# Altium PCB asar_feather.PcbDoc (part 4 of 4)
Units mm, origin at the board's own origin, x right, y up, seen from the top; angles counter-clockwise.
Board outline 50.8 x 22.86 mm, 6 copper layers (Top Layer, L2-GND, L3-SIG, L4-SIG, L5-VCC3V3, Bottom Layer), stack 1.568 mm thick; 174 components, 154 nets, 827 pads, 1521 vias.
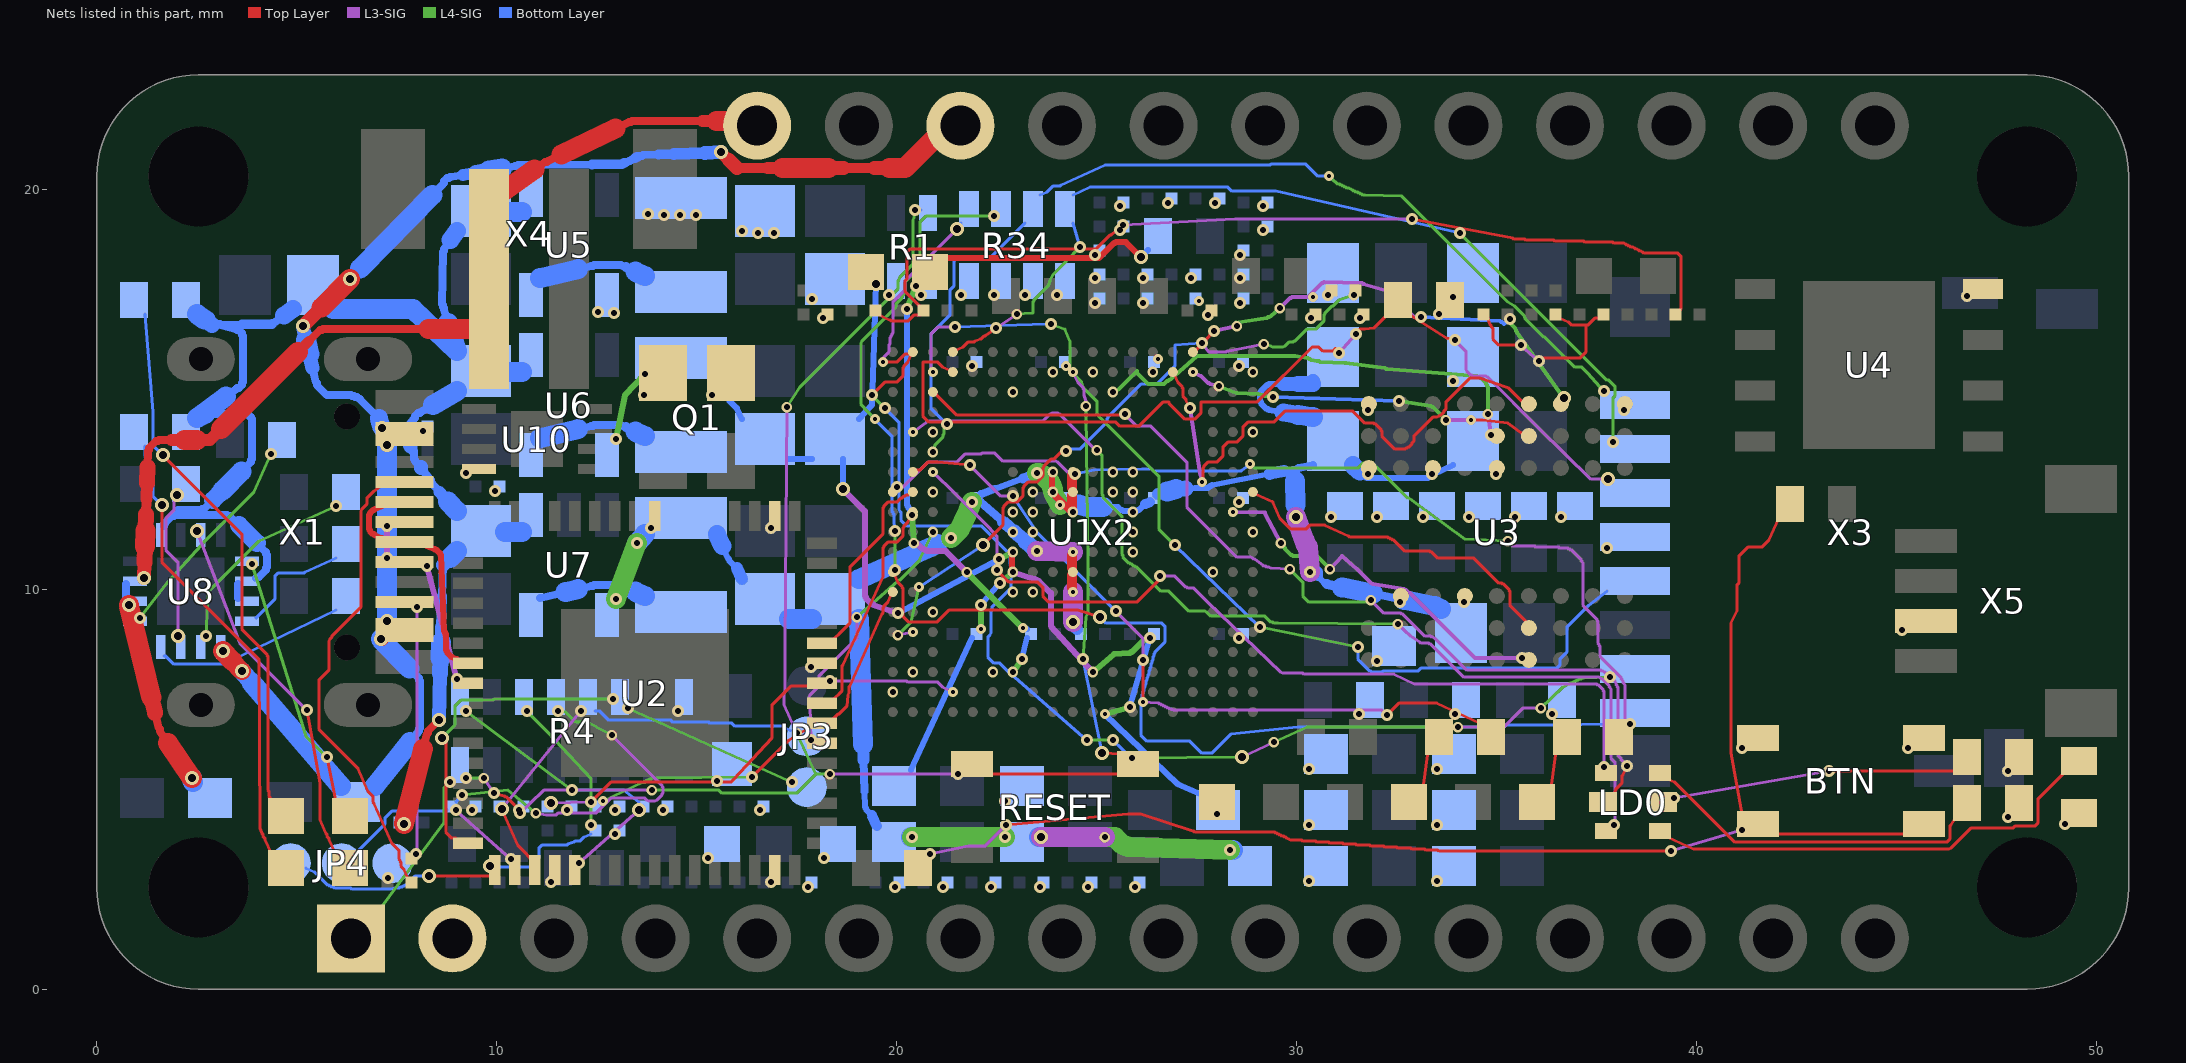
[diagram p7: the nets of this part, all layers, seen from the top]

## Via types
v1: diameter 0.27, hole 0.15, L3-SIG to L4-SIG, tented both sides, 233 vias
v2: diameter 0.3, hole 0.15, L5-VCC3V3 to Bottom Layer, tented both sides, 219 vias
v3: diameter 0.3, hole 0.15, Top Layer to L2-GND, tented both sides, 208 vias
v4: diameter 0.25, hole 0.1, Top Layer to L2-GND, tented both sides, 175 vias
v5: diameter 0.3, hole 0.15, L2-GND to L3-SIG, tented both sides, 171 vias
v6: diameter 0.3, hole 0.15, L4-SIG to L5-VCC3V3, tented both sides, 171 vias
v7: diameter 0.35, hole 0.2, Top Layer to Bottom Layer, tented both sides, 165 vias
v8: diameter 0.25, hole 0.1, L2-GND to L3-SIG, tented both sides, 106 vias
v9: diameter 0.25, hole 0.1, L4-SIG to L5-VCC3V3, tented both sides, 49 vias
v10: diameter 0.25, hole 0.1, L5-VCC3V3 to Bottom Layer, tented both sides, 24 vias

## Nets (pads, with @x,y where several pads share a name; then routed paths per layer and width w, separated by ;. In a path a pad name is that pad's centre, name@x,y a point inside that pad or via, vN(x,y) a via of type N, cw(c..) or ccw(c..) an arc to the next point about the centre after c; other vN are vias at no path point) (continued)
LDQM: U1.U8 U3.E8 | length 11.4
  L3-SIG w0.1: v1(34.775,14.375) v3(34.85,13.85)
  L4-SIG w0.1: v1@25.4,14.925 25.55,15 26.002,15.452 ; 25.975,15.425 26.25,15.15 26.3,15.125 26.675,15.125 26.75,15.2 26.775,15.2 26.8,15.225 26.85,15.25 27.5,15.825 ; 27.49,15.825 29.95,15.825 30.264,15.783 ; 30.275,15.775 30.3,15.75 30.325,15.75 30.35,15.725 30.5,15.7 30.55,15.7 30.575,15.675 31.225,15.65 ; 31.217,15.656 32.2,15.525 32.225,15.5 32.25,15.5 34.5,15.325 34.525,15.3 34.55,15.3 34.6,15.275 34.725,15.15 34.725,15.125 34.75,15.1 34.75,15.075 34.775,15.05 v1(34.775,14.375)
  other v1: 25.4,14.93
  other v4: 25.4,14.93
  other v5: 34.85,13.85
  other v8: 25.4,14.93
LED0_B: LD0.2 U1.N17 | length 22.1
  Top Layer w0.076: v3(22.5,10.475) 22.8,10.175 23.525,10.175 23.65,10.05 23.65,9.825 23.8,9.675 26,9.675 26.575,10.25 v3(26.575,10.325)
  L3-SIG w0.076: v8@20.9,12.925 21.275,12.575 22.3,11.55 22.5,11.325 v3(22.5,10.475) ; v3(26.575,10.325) 26.95,10.325 27.225,10.05 27.25,10.05 27.275,10.025 27.425,10.025 27.775,9.675 29.6,7.925 29.65,7.9 30.15,7.9 30.175,7.875 32.425,7.875 32.95,7.625 37.5,7.625 37.525,7.6 37.55,7.6 37.65,7.5 37.65,7.475 37.675,7.45 v3(37.675,5.55)
  other v4: 20.9,12.93
  other v5: 37.675,5.55 26.575,10.325 22.5,10.475
  other v8: 20.9,12.93
LED0_G: LD0.6 U1.R18 | length 25.1
  L3-SIG w0.076: v8@20.4,13.925 20.775,14.2 23.65,14.2 23.825,14.375 23.85,14.375 23.875,14.4 24.025,14.4 24.05,14.375 24.075,14.375 24.975,13.475 v1(25,13.475) ; v1(32.525,9.125) 32.85,8.825 32.925,8.775 33,8.725 33.075,8.675 33.1,8.65 33.3,8.65 33.325,8.625 33.35,8.625 34.175,7.8 37.55,7.8 37.6,7.775 37.625,7.75 37.65,7.75 37.8,7.6 37.8,7.575 37.825,7.55 37.85,7.5 37.85,5.775 37.95,5.675 37.95,4.125 v3(37.925,4.1)
  L4-SIG w0.076: v1(25,13.475) 25.125,13.35 25.125,12.375 25.15,12.35 25.15,12.3 25.625,11.825 25.625,10.875 25.65,10.85 25.65,10.8 25.8,10.65 25.825,10.65 25.85,10.625 25.875,10.625 25.925,10.575 25.95,10.575 25.975,10.55 26,10.55 26.6,9.95 26.8,9.95 27.3,9.45 27.7,9.45 27.75,9.425 27.85,9.325 29.2,9.325 29.35,9.175 29.4,9.175 29.425,9.15 29.525,9.15 v1(32.525,9.125)
  other v4: 20.4,13.93
  other v5: 37.925,4.1
  other v8: 20.4,13.93
LED0_R: LD0.4 U1.U17 | length 23.9
  Top Layer w0.076: U1.U17@20.975,14.875 21.5,14.35 25.675,14.35 v3(25.7,14.375) ; LD0.4@37.925,4.875 37.975,5 38.125,5.15 38.125,5.325 38.15,5.35 v3(38.25,5.575)
  L3-SIG w0.076: v3(25.7,14.375) 26,14.075 26.35,14.075 27.25,13.175 27.25,12.05 28.5,10.8 28.85,10.8 28.9,10.775 28.925,10.75 28.95,10.75 29.15,10.6 29.175,10.575 29.225,10.575 29.25,10.55 29.3,10.55 29.35,10.525 v1(29.825,10.5) ; v1(31.85,9.725) 32.175,9.4 32.6,9.4 32.625,9.375 32.65,9.375 33.2,8.825 33.35,8.825 33.375,8.8 33.4,8.8 33.45,8.775 34.25,7.975 37.6,7.975 37.625,7.95 37.65,7.95 37.7,7.925 37.725,7.9 37.75,7.9 37.95,7.7 37.975,7.65 37.975,7.625 38,7.6 38,7.575 38.025,7.55 38.025,5.85 38.1,5.775 38.1,5.75 38.125,5.725 v3(38.25,5.575)
  L4-SIG w0.076: v1(29.825,10.5) 30.15,10.175 30.15,9.825 30.3,9.675 31.8,9.675 v1(31.85,9.725)
  other v5: 38.25,5.575 25.7,14.375
LED1: R83.1 U1.N18 | length 18
  Top Layer w0.076: U1.N18@20.475,12.975 20.575,12.975 20.775,13.175 21.025,13.175 v3(21.825,13.1) ; v4(26.15,7.175) v3(26.15,8.225) ; v3(32.25,6.85) 32.55,7.15 33.5,7.15 R83.1@34.575,6.65
  L3-SIG w0.076: v3(21.825,13.1) 22.6,12.325 v1(22.9,12.325) ; v6(25.475,9.45) 26.15,8.775 v3(26.15,8.225) ; v4(26.15,7.175) 26.525,7.15 26.55,7.15 26.575,7.125 26.6,7.125 26.625,7.1 26.65,7.1 26.675,7.075 26.7,7.075 26.725,7.05 26.75,7.05 26.775,7.025 26.8,7.025 26.825,7 26.875,7 26.9,6.975 32.125,6.975 v3(32.25,6.85)
  Bottom Layer w0.076: v1(22.9,12.325) 23.5,11.425 v6(25.475,9.45)
  other v1: 25.475,9.45
  other v2: 25.475,9.45 22.9,12.325
  other v5: 32.25,6.85 26.15,8.225 21.825,13.1
  other v6: 22.9,12.325
  other v8: 26.15,7.175
LED2: R84.1 U1.M19 | length 23.4
  Top Layer w0.076: U1.M19@19.95,12.5 v3(20,12.55)
  L3-SIG w0.076: v3(20,12.55) 20.15,12.55 20.775,13.175 21.5,13.175 21.7,13.375 22.1,13.375 22.125,13.4 22.45,13.4 22.65,13.2 23.975,13.2 24.025,13.175 24.325,12.875 v1(24.45,12.875) ; v1(35.275,11.2) 35.4,11.075 35.95,11.075 35.975,11.05 36.55,11.05 36.575,11.025 36.775,11.025 36.8,11 36.825,11 36.85,10.975 36.875,10.975 37.1,10.75 37.1,10.725 37.125,10.7 37.15,10.65 37.15,9.6 37.5,9.25 37.5,9.225 37.525,9.2 37.525,8.65 37.55,8.625 37.55,8.6 37.575,8.575 37.575,8.325 38.1,7.8 38.1,7.775 38.125,7.75 38.15,7.7 38.15,7.675 38.175,7.65 38.2,7.6 38.2,6.75 v3(38.325,6.625)
  L4-SIG w0.076: v9(28.825,13.125) 28.925,13.025 31.525,13.025 31.65,13.15 31.9,13.15 32.775,12.275 32.8,12.275 32.875,12.225 32.975,12.15 33.075,12.075 33.175,12 33.25,11.95 33.35,11.875 33.45,11.8 33.55,11.725 33.625,11.675 33.725,11.6 33.825,11.525 33.925,11.45 34,11.4 34.1,11.325 34.2,11.25 v1(35.275,11.2)
  Bottom Layer w0.076: v1(24.45,12.875) 24.925,12.975 26.125,13 26.375,13 26.425,12.95 28.6,12.95 28.625,12.975 v9(28.825,13.125)
  other v2: 24.45,12.875
  other v5: 38.325,6.625 20,12.55
  other v6: 24.45,12.875
  other v10: 28.825,13.125
N$BTN: BTN.3 BTN.4 R85.1 R86.2 | length 32.3
  Top Layer w0.076: R86.2@20.8,3.375 v3(20.825,3.375) ; v3(22.725,4.1) 25.775,4.375 26.1,4.375 27.4,3.95 27.425,3.95 27.45,3.925 29.45,3.925 29.475,3.9 29.5,3.9 29.525,3.875 29.55,3.875 29.575,3.85 29.6,3.85 29.625,3.825 29.675,3.825 29.7,3.8 29.725,3.8 29.75,3.775 29.8,3.75 29.85,3.725 30.125,3.725 30.15,3.7 30.475,3.7 30.5,3.675 30.8,3.675 30.825,3.65 31.15,3.65 31.175,3.625 31.475,3.625 31.5,3.6 31.825,3.6 31.85,3.575 32.175,3.575 32.2,3.55 32.5,3.55 32.525,3.525 32.85,3.525 32.875,3.5 33.2,3.5 33.225,3.475 33.525,3.475 33.55,3.45 v3(39.35,3.45) ; BTN.3@41.125,4.375 40.85,5.9 40.85,9.15 41,9.45 41,10.1 41.05,10.15 41.05,10.825 41.275,11.05 41.625,11.05 41.8,11.225 R85.1@42.05,11.775 ; BTN.3@41.925,3.875 BTN.4@45.275,3.875
  L3-SIG w0.076: v3(20.825,3.375) 21.775,3.575 22.2,3.575 v3(22.725,4.1) ; v3(39.35,3.45) v3(41.125,3.975)
  other v5: 20.825,3.375 39.35,3.45 41.125,3.975 22.725,4.1
N$LD0B: LD0.1 R80.2 | length 8.3
  Top Layer w0.076: LD0.1@39.275,5.25 39.45,5.175 40.95,3.675 46.25,3.675 46.325,3.75 46.325,4.075 46.35,4.1 R80.2@46.475,4.3
N$LD0G: LD0.5 R82.2 | length 11.1
  Top Layer w0.076: LD0.5@39.275,3.8 39.925,3.5 46.3,3.5 46.35,3.525 46.85,4.025 47.9,4.025 47.95,4.075 48.45,4.075 48.525,4.15 48.525,4.75 R82.2@49.2,5.425
N$LD0R: LD0.3 R81.2 | length 7.1
  Top Layer w0.076: v3(43.3,5.45) R81.2@46.475,5.45
  L3-SIG w0.076: v3(39.425,4.775) v3(43.3,5.45)
  other v5: 39.425,4.775 43.3,5.45
N$LD1A: LD1.A R83.2 | length 0.9
  Top Layer w0.076: LD1.A@33.15,5.025 R83.2@33.275,5.95
N$LD2A: LD2.A R84.2 | length 0.9
  Top Layer w0.076: LD2.A@36.35,5.025 R84.2@36.475,5.95
NetL1_1: L1.1 U5.5 | length 2.7
  Bottom Layer w0.2: 12.031,18 12.35,18.075 12.4,18.075 12.425,18.1 13.1,18.1 13.225,18.05
  Bottom Layer w0.25: 13.225,18.05 L1.1@13.463,17.938
  Bottom Layer w0.5: U5.5@11.075,17.775 12.031,18 ; L1.1@13.463,17.938 L1.1@13.7,17.825
NetL2_1: L2.1 U6.5 | length 2.7
  Bottom Layer w0.2: 12.031,14 12.35,14.075 12.4,14.075 12.425,14.1 13.1,14.1 13.225,14.05
  Bottom Layer w0.25: 13.225,14.05 L2.1@13.463,13.938
  Bottom Layer w0.5: U6.5@11.075,13.775 12.031,14 ; L2.1@13.463,13.938 L2.1@13.7,13.825
NetL3_1: L3.1 U7.5 | length 2.7
  Bottom Layer w0.2: U7.5@11.075,9.775 11.712,9.925 ; 12.031,10 12.35,10.075 12.4,10.075 12.425,10.1 13.1,10.1 13.225,10.05
  Bottom Layer w0.25: 13.225,10.05 L3.1@13.463,9.938
  Bottom Layer w0.5: 11.712,9.925 12.031,10 ; L3.1@13.463,9.938 L3.1@13.7,9.825
NetLD3_A: LD3.A R107.1 | length 11.5
  Top Layer w0.076: v7(1.625,12.1) 1.625,10.675 4.05,8.25 4.075,4.025 4.125,3.9 4.15,3.875 4.15,3.825 4.2,3.775 4.2,3.75 LD3.A@4.375,3.375
  Bottom Layer w0.076: R107.1@1.2,13.575 1.2,13.325 1.4,13.125 1.4,12.325 v7(1.625,12.1)
NetLD3_K: LD3.K U8.7 | length 9.1
  Top Layer w0.076: v3(5.25,6.975) 5.575,5.15 5.575,4.25 5.725,3.9 5.75,3.875 5.75,3.825 5.8,3.775 5.8,3.75 LD3.K@5.975,3.375
  L3-SIG w0.076: v7(2.5,11.45) 3.575,8.65 v3(5.25,6.975)
  Bottom Layer w0.076: v7(2.5,11.45) U8.7@2.525,11.45
  other v5: 5.25,6.975
NetLD4_A: LD4.A R108.1 | length 13.4
  Top Layer w0.076: v7(1.65,13.35) 3.625,11.375 3.625,9 4.25,8.375 4.25,8.35 4.275,8.325 4.275,4.975 4.3,4.95 4.3,4.825 4.325,4.8 LD4.A@4.375,4.675
  Bottom Layer w0.076: R108.1@1.2,16.875 1.4,14.425 1.4,13.6 v7(1.65,13.35)
NetLD4_K: LD4.K U8.9 | length 6.4
  Top Layer w0.076: v1(5.75,5.8) LD4.K@5.975,4.675
  L4-SIG w0.076: v6(3.875,10.625) 5.225,6.325 v1(5.75,5.8)
  other v2: 3.875,10.625
  other v3: 5.75,5.8
  other v5: 5.75,5.8
NetR102_2: R102.2 U8.16 | length 4.7
  Bottom Layer w0.076: U8.16@1.675,8.325 1.725,8.325 1.925,8.125 3.275,8.125 3.375,8.225 R102.2@5.975,9.475
NetR103_2: R103.2 U8.12 | length 2.9
  Bottom Layer w0.076: U8.12@3.975,9.275 4.45,9.75 4.45,10.325 4.525,10.4 5.175,10.4 5.2,10.425 R103.2@5.975,10.775
NetR104_2: R104.2 U8.14 | length 5.1
  L4-SIG w0.076: v6(2.725,8.825) 2.775,9.925 4.05,11.2 v6(5.975,12.075)
  Bottom Layer w0.076: U8.14@2.675,8.775 v6(2.725,8.825)
  other v2: 2.725,8.825 5.975,12.075
NetR105_2: R105.2 U8.15 | length 3.8
  L3-SIG w0.076: v7(2,12.35) 1.925,12.225 1.925,11.975 1.725,11.775 1.725,10.975 2.025,10.675 v7(2.025,8.825)
  Bottom Layer w0.076: U8.15@2.025,8.775 v7(2.025,8.825)
NetR106_2: R106.2 U8.1 | length 5.3
  L4-SIG w0.076: v6(1.075,9.275) 1.775,10.175 2.725,11.225 3.925,12.425 v6(4.35,13.375)
  other v2: 1.075,9.275 4.35,13.375
NODE_P0: R10.1 R11.2 R12.2 | length 5
  Top Layer w0.076: R10.1@34.775,16.775 34.8,16.675 34.825,16.625 34.85,16.6 34.85,16.575 34.9,16.525 34.9,16.25 35.05,16.1 v3(35.6,16.1) ; v3(36.05,15.7) 36.125,15.775 37.075,15.775 37.225,15.925 37.225,16.6 ; R11.2@36.575,16.775 36.8,16.675 36.875,16.6 37.275,16.6 37.45,16.775 R12.2@37.55,16.775
  L3-SIG w0.076: v3(35.6,16.1) v3(36.05,15.7)
  other v5: 36.05,15.7 35.6,16.1
NODE_P1: R14.1 R15.2 R16.2 | length 23.8
  Top Layer w0.076: R15.2@19.575,16.85 19.825,16.725 19.85,16.725 19.875,16.7 20.275,16.7 20.425,16.85 R16.2@20.575,16.85 ; R16.2@20.575,17.075 20.2,17.45 20.2,17.7 20.25,17.75 20.25,18.425 20.325,18.5 24.975,18.5 25.325,18.85 25.35,18.85 25.375,18.875 v3(25.65,19.1) ; v3(32.875,19.25) 35.4,18.775 35.425,18.75 35.7,18.75 35.725,18.725 36.425,18.725 36.45,18.7 37.175,18.7 37.2,18.675 37.9,18.675 37.925,18.65 38.175,18.65 38.225,18.625 38.25,18.6 38.275,18.6 38.3,18.575 38.325,18.575 38.35,18.55 38.4,18.55 38.45,18.525 38.475,18.5 38.5,18.5 38.55,18.475 38.575,18.45 38.6,18.45 38.65,18.425 38.675,18.4 39.525,18.4 39.6,18.325 39.6,17 R14.1@39.575,16.975
  L3-SIG w0.076: v3(25.65,19.1) 28.45,19.25 v3(32.875,19.25)
  other v5: 25.65,19.1 32.875,19.25
PROG#: R4.1 R99.1 U2.21 | length 7.1
  L3-SIG w0.076: v3(12.05,3.15) v7(13.55,4.475)
  L4-SIG w0.076: v6(9.225,6.95) v6(11.875,4.975)
  Bottom Layer w0.076: v6(11.875,4.975) 13.175,4.975 R99.1@13.55,4.675
  other v2: 11.875,4.975 9.225,6.95
  other v5: 12.05,3.15
PUDC_B: R23.2 U1.E18 | length 16.6
  Top Layer w0.076: v7(22.15,11.1) 22.65,11.6 22.65,12.025 22.675,12.05 22.675,12.075 22.775,12.175 23,12.175 23.15,12.325 23.15,12.525 23.175,12.55 23.175,12.575 23.275,12.675 23.5,12.675 23.65,12.825 23.65,13.025 23.675,13.05 23.675,13.075 23.85,13.25 23.925,13.25 24.125,13.45 v3(24.225,13.45)
  L3-SIG w0.076: v1(20.025,8.85) v8@20.4,8.925 ; v6(27.625,16.15) 27.8,15.925 ; 27.799,15.925 28.225,15.925 28.25,15.95 28.3,15.95 v1(29.175,16.125)
  L4-SIG w0.076: v1(20.025,8.85) 20.35,9.175 v9(20.55,10.05) ; v1(29.175,16.125) 29.35,16.075 29.4,16.05 29.65,16.05 29.7,16.075 29.8,16.175 29.9,16.175 29.925,16.2 29.95,16.2 30.25,16.5 30.475,16.5 30.675,16.7 30.675,16.85 30.7,16.875 30.7,16.9 30.875,17.075 30.9,17.075 31.05,17.225 v1(31.425,17.35)
  Bottom Layer w0.076: v9(20.55,10.05) v7(22.15,11.1) ; v3(24.225,13.45) 24.275,13.5 24.575,13.5 25.25,14.175 25.25,14.25 25.275,14.275 25.275,14.3 26.1,15.125 26.475,15.125 26.525,15.15 26.95,15.575 26.95,16.1 v6(27.625,16.15)
  other v1: 24.225,13.45 27.625,16.15
  other v2: 27.625,16.15
  other v4: 20.4,8.93 31.425,17.35
  other v5: 24.225,13.45
  other v8: 20.4,8.93 31.425,17.35
  other v9: 24.225,13.45
  other v10: 20.55,10.05 24.225,13.45
RAS#: U1.V4 U3.F8 | length 8.7
  Top Layer w0.076: v4(34.35,14.225) 34.65,14.225 35.275,14.15 U3.F8@35.65,13.875
  L3-SIG w0.1: v8@27.4,15.425 27.6,15.325 27.775,15.15 27.8,15.15 27.825,15.125 v1(28.05,15.075) ; v1(33.725,14.225) v4(34.35,14.225)
  L4-SIG w0.1: v1(28.05,15.075) 28.5,14.9 29.025,14.875 29.175,14.85 29.2,14.825 29.225,14.825 v6(29.4,14.8) ; v6(32.55,14.7) 33.35,14.575 33.375,14.55 33.4,14.55 v1(33.725,14.225)
  Bottom Layer w0.1: v6(29.4,14.8) v6(32.55,14.7)
  other v2: 32.55,14.7 29.4,14.8
  other v4: 27.4,15.43
  other v8: 34.35,14.225 27.4,15.43
RST#: R1.2 R4.16 RESET.1 RESET.2 U1.V10 X2.1 | length 46.4
  Top Layer w0.076: v3(9.925,4.9) 10.175,4.825 10.2,4.825 10.225,4.8 10.25,4.8 10.425,4.625 v3(10.575,4.4) ; RESET.1@22.275,5.375 RESET.2@25.625,5.375 ; v7(25.125,5.9) RESET.2@25.625,5.875
  L3-SIG w0.076: v1(9.675,5.275) v3(9.925,4.9) ; v3(10.575,4.4) 11.15,4.95 11.175,4.975 v1(13.875,4.975) ; v1(17.25,14.55) 17.2,8.55 17.2,7.425 17.175,7.4 17.175,7.125 v1(17.5,6.4) ; v1(18.325,5.375) v3(21.525,5.375) ; v8@24.4,15.425 24.525,15.175 24.65,15.05 24.65,15.025 24.675,15 24.675,14.85 24.725,14.7 v1(24.725,14.575)
  L4-SIG w0.076: X2.1@7.025,1.925 8.675,4.15 8.675,5.025 v6(8.825,5.175) ; v6(9.225,5.275) v1(9.675,5.275) ; v1(13.875,4.975) 15.55,4.975 15.625,4.9 17.5,4.9 17.975,5.375 ; v1(17.25,14.55) 17.575,15.05 20.025,17.5 20.025,17.7 20.05,17.725 20.05,17.75 20.075,17.8 20.4,18.125 20.4,19.225 20.425,19.275 v6(20.45,19.475) ; v1(17.5,6.4) 17.975,5.375 ; v1(18.325,5.375) 17.975,5.375 ; v6(24.65,8.25) 24.725,9.3 24.75,9.35 24.775,9.4 24.775,10.775 24.729,14.406 ; 24.725,14.4 v1(24.725,14.575)
  Bottom Layer w0.076: v6(8.825,5.175) R4.16@8.9,5.25 ; v6(20.45,19.475) R1.2@20.6,19.475 ; v6(24.65,8.25) v7(25.125,5.9)
  other v2: 8.825,5.175 9.225,5.275 24.65,8.25 20.45,19.475
  other v4: 24.4,15.43
  other v5: 10.575,4.4 9.925,4.9 21.525,5.375
  other v8: 24.4,15.43
SD-CLK: U1.V17 X3.5 | length 24.3
  L3-SIG w0.076: v8@20.9,15.425 20.85,15.475 20.85,16.375 21.025,16.55 v6(21.45,16.55)
  L4-SIG w0.076: v6(23.85,16.625) 24.2,16.5 24.325,16.2 ; 24.325,16.21 24.325,15.475 24.61,15.19 ; 24.6,15.2 24.65,15.05 25,14.7 25,14.375 26.55,12.825 26.55,11.5 v6(26.95,11.1) ; v6(29.075,9.05) v6(31.525,8.55)
  Bottom Layer w0.076: v6(21.45,16.55) 23.775,16.625 v6(23.85,16.625) ; v6(26.95,11.1) v6(29.075,9.05) ; v6(31.525,8.55) 31.525,8.25 31.825,7.95 31.85,7.95 31.875,7.925 32.125,7.925 32.15,7.95 33.025,7.95 33.1,8.025 36.5,8.025 36.575,8.1 36.575,8.25 36.75,8.425 36.75,9.05 37.3,9.6 X3.5@37.75,9.95
  other v1: 21.45,16.55
  other v2: 31.525,8.55 29.075,9.05 26.95,11.1 21.45,16.55 23.85,16.625
  other v4: 20.9,15.43
  other v8: 20.9,15.43
SD-CMD: R35.1 U1.V16 X3.3 | length 22.7
  Top Layer w0.076: U1.V16@21.325,15.475 21.15,15.55 21.025,15.675 20.65,15.675 20.65,14.325 20.8,14.175 25.475,14.175 25.575,14.075 26.05,14.075 26.65,14.675 26.801,14.675 ; 26.8,14.675 26.8,14.65 27.2,14.25 27.45,14.25 27.6,14.4 27.6,14.675 29,14.675 30.382,16.057 ; 30.375,16.05 30.55,16.05 30.65,15.95 30.9,15.95 v3@30.971,16.021 ; v3@30.95,16 v3(31.05,15.9) ; v3(31.475,16.375) 31.475,16.4 31.575,16.5 ; 31.587,16.5 31.7,16.5 31.925,16.525 R35.1@32.275,16.875 ; R35.1@32.8,16.875 33.75,16.271 ; 33.75,16.275 v3(33.95,16.225)
  L3-SIG w0.076: v3(31.05,15.9) v3(31.475,16.375) ; v3(33.95,16.225) 34.225,15.95 34.225,15.5 34.25,15.45 34.35,15.35 34.375,15.35 34.4,15.325 34.725,15.325 34.775,15.3 ; 34.77,15.305 36.05,14.025 37.35,12.75 v7(37.775,12.75)
  Bottom Layer w0.076: X3.3@37.775,12.675 v7(37.775,12.75)
  other v5: 31.05,15.9 33.95,16.225 31.475,16.375
SD-DAT0: R34.1 U1.W18 X3.7 | length 33.1
  Top Layer w0.076: v1(19.375,14.85) 19.7,15.175 20,15.175 20.15,15.325 20.15,15.525 20.175,15.55 20.175,15.575 20.275,15.675 U1.W18@20.35,15.85 ; v4(19.65,15.675) 20,15.675 20.2,15.875 U1.W18@20.325,15.875
  L3-SIG w0.076: v4(19.65,15.675) 19.675,15.8 19.8,15.925 19.8,16.1 19.825,16.125 19.825,16.275 19.85,16.3 19.85,16.325 19.875,16.35 19.875,16.375 19.9,16.4 19.9,17.175 20.2,17.475 20.2,17.7 v7(21.5,19) ; v7(28.625,5.8) v1(29.425,6.175) ; v1(34.025,6.55) 35.175,6.55 35.65,7.025 v1(36.1,7.025)
  L4-SIG w0.076: v1(19.375,14.85) v6(19.7,14.525) ; v6(24.75,6.225) v6(25.4,6.225) ; v6(25.875,5.775) v7(28.625,5.8) ; v1(29.425,6.175) 30.25,6.55 v1(34.025,6.55) ; v1(36.1,7.025) 36.65,7.55 36.7,7.575 36.725,7.6 36.75,7.6 36.8,7.625 36.825,7.65 36.875,7.65 36.9,7.675 36.925,7.675 36.95,7.7 36.975,7.7 37,7.725 37.025,7.725 37.05,7.75 37.1,7.75 37.125,7.775 37.175,7.775 v6(37.825,7.8)
  Bottom Layer w0.076: v6(19.7,14.525) 20.05,14.175 20.05,12 20.075,11.95 20.1,11.925 20.1,11.725 20.25,11.575 22.125,11.575 22.825,10.875 22.825,10.625 22.85,10.6 22.85,10.025 22.375,9.55 22.375,9.475 22.35,9.45 22.35,8.9 22.325,8.85 22.275,8.8 22.275,8.3 22.425,8.15 22.575,8.15 22.9,7.825 22.95,7.8 v6(24.75,6.225) ; v7(21.5,19) R34.1@21.6,19.15 ; v6(25.4,6.225) v6(25.875,5.775)
  other v2: 25.875,5.775 24.75,6.225 25.4,6.225 37.825,7.8 19.7,14.525
  other v3: 19.375,14.85
  other v5: 19.375,14.85
  other v8: 19.65,15.675
SD-DAT1: R34.2 U1.H19 X3.8 | length 34.5
  Top Layer w0.076: U1.H19@19.95,10.35 20.025,10.175 20.125,10.075 20.125,10.05 20.15,10.025 20.15,9.325 20.3,9.175 21,9.175 21.3,9.475 24.525,9.475 v7(25.075,9.3)
  L4-SIG w0.076: v9(19.45,14.25) 19.1,14.625 19.1,16.15 19.125,16.2 19.975,17.05 19.975,17.125 20.125,17.275 20.125,17.3 20.15,17.325 20.15,17.35 20.175,17.375 20.175,17.425 20.2,17.45 20.2,17.65 20.225,17.7 20.575,18.05 20.575,19.175 20.725,19.325 v6(22.425,19.325) ; v3(19.95,10.475) v6(19.95,11.45)
  Bottom Layer w0.076: v9(19.45,14.25) 19.875,13.825 19.875,11.95 19.9,11.925 19.9,11.9 19.925,11.875 19.925,11.675 v6(19.95,11.45) ; v7(25.075,9.3) 25.225,9.15 26.625,9.15 26.7,9.075 26.7,8.675 26.45,8.425 26.45,8.4 26.425,8.375 26.425,8.325 26.4,8.3 26.4,8.225 26.375,8.2 26.375,8.15 26.35,8.125 26.35,8.05 26.325,8.025 26.325,7.975 26.3,7.95 26.3,7.875 26.275,7.85 26.275,7.8 26.25,7.775 26.25,7.725 26.225,7.7 26.225,7.625 26.2,7.6 26.2,7.55 26.175,7.525 26.175,7.45 26.15,7.425 26.15,7.375 26.125,7.35 26.125,7.275 26.1,7.25 26.1,6.35 26.25,6.2 27.325,6.2 27.625,5.9 27.875,5.9 28.35,6.375 30.025,6.55 35.175,6.55 35.225,6.6 36.5,6.6 X3.8@37.75,6.625
  other v1: 19.95,10.475
  other v2: 19.95,11.45 22.425,19.325
  other v5: 19.95,10.475
  other v10: 19.45,14.25
SD-DAT2: R34.3 U1.P17 X3.1 | length 24.2
  L4-SIG w0.076: v1@20.9,13.425 20.95,13.6 21.15,13.8 21.15,13.85 21.175,13.875 21.175,14.05 v6(21.25,14.125) ; v9(30.8,20.325) 31,20.15 31.025,20.125 31.075,20.125 31.1,20.1 31.125,20.1 31.15,20.075 31.175,20.075 31.2,20.05 31.225,20.05 31.25,20.025 31.3,20.025 31.35,20 31.4,19.975 31.425,19.95 31.45,19.95 31.475,19.925 31.525,19.925 31.55,19.9 31.575,19.9 31.6,19.875 31.625,19.875 31.65,19.85 31.7,19.85 32.625,19.825 35.253,17.197 ; 35.25,17.2 35.45,17.075 35.675,16.85 35.7,16.775 36.175,16.3 36.2,16.3 36.95,15.55 37.125,15.55 37.275,15.4 v6(37.675,14.95)
  Bottom Layer w0.076: v6(21.25,14.125) 20.85,14.525 20.85,16.375 21.325,16.85 21.325,17.475 21.425,17.575 21.425,18.2 21.5,18.275 22.325,18.275 R34.3@23.2,19.15 ; R34.3@23.575,19.85 23.75,19.925 23.9,20.075 24.075,20.075 24.1,20.1 25.2,20.6 29.325,20.6 29.35,20.625 30.225,20.625 30.525,20.325 v9(30.8,20.325) ; v6(37.675,14.95) X3.1@37.75,14.875
  other v1: 20.9,13.43
  other v2: 21.25,14.125 37.675,14.95
  other v4: 20.9,13.43
  other v8: 20.9,13.43
  other v10: 30.8,20.325
SD-DAT3: R34.4 U1.W16 X3.2 | length 21.7
  Top Layer w0.076: U1.W16@21.475,15.975 21.65,16.05 21.775,16.175 21.925,16.175 21.95,16.2 22.075,16.25 22.1,16.25 22.175,16.325 22.2,16.325 22.225,16.35 v3(22.475,16.525)
  L3-SIG w0.076: v3(22.475,16.525) v1(23,16.875)
  L4-SIG w0.076: v1(23,16.875) 23.375,16.9 23.4,16.9 23.4,17.175 23.425,17.2 23.425,17.225 23.775,17.575 23.825,17.7 ; 23.813,17.7 23.9,17.85 ; 23.903,17.861 v6(24.575,18.55) ; v6(34.075,18.9) 37.75,15.225 37.8,15.225 37.95,15.075 37.95,14.825 37.9,14.775 v6(37.9,13.675)
  Bottom Layer w0.076: R34.4@24.4,19.15 v6(24.575,18.55) ; R34.4@24.4,19.85 24.825,20.05 28.275,20.05 28.375,19.95 29.475,19.95 v6(34.075,18.9)
  other v2: 37.9,13.675 24.575,18.55 34.075,18.9
  other v5: 22.475,16.525
SDRAM-CLK: U1.M1 U3.F2 | length 8.4
  Top Layer w0.076: U1.M1@28.975,12.375 29.392,12.187 ; 29.4,12.175 29.575,11.775 29.85,11.5 30.225,11.5 30.325,11.6 30.7,11.6 ; 30.692,11.6 31.3,11.325 31.325,11.3 32.275,11.3 32.3,11.275 32.325,11.275 32.35,11.25 32.375,11.25 32.4,11.225 32.425,11.225 32.7,10.95 33.325,10.95 33.35,10.925 33.375,10.925 33.525,10.775 34.425,10.775 35.05,10.15 35.125,10.15 35.15,10.125 35.175,10.125 35.3,10 35.3,9.975 35.325,9.95 35.325,9.6 U3.F2@35.75,9.175
SDRAM-CS#: U1.W4 U3.G9 | length 11.4
  Top Layer w0.076: U1.W4@27.475,15.975 v3(27.925,16.45) ; U3.G9@36.65,14.775 v7(36.675,14.775)
  L3-SIG w0.1: v3(27.925,16.45) v1(28.5,16.575) ; v1(29.575,17.025) 29.825,17.275 29.85,17.275 29.875,17.3 30.275,17.3 30.625,17.65 30.65,17.65 30.675,17.675 31.625,17.65 31.65,17.625 31.675,17.625 32.2,17.475 32.225,17.45 32.25,17.45 32.3,17.425 32.925,16.8 v6(33.1,16.8)
  L4-SIG w0.1: v1@28.473,16.662 29.25,16.775 29.275,16.8 29.3,16.8 29.35,16.825 v1(29.575,17.025) ; v1@28.475,16.65 v1(28.5,16.575) ; v6(35.325,16.75) 35.325,16.65 35.45,16.525 35.475,16.475 35.475,16.45 35.5,16.425 v7(36.675,14.775)
  Bottom Layer w0.1: v6(33.1,16.8) 35.075,16.7 35.1,16.675 35.125,16.675 35.175,16.625 v6(35.325,16.75)
  other v1: 33.1,16.8
  other v2: 35.325,16.75 33.1,16.8
  other v5: 27.925,16.45
TCK: JP3.1 R4.6 U2.16 | length 12.2
  Top Layer w0.076: v7(8.625,6.275) 8.725,6.175 8.725,3.925 8.875,3.775 8.975,3.775 U2.16@9,3.75
  L4-SIG w0.076: v7(8.625,6.275) 8.95,6.6 8.95,7.075 9.1,7.225 9.9,7.225 9.925,7.25 v6(12.9,7.25) ; v6(13.275,7.025) v6(17.375,5.175)
  Bottom Layer w0.076: R4.6@13.25,7.025 v6(13.275,7.025)
  other v2: 17.375,5.175 13.275,7.025 12.9,7.25
TDI: JP4.1 R4.3 R90.1 U2.17 | length 11.5
  Top Layer w0.076: v7(8.3,2.825) U2.17@9.85,2.825 ; v7(9.825,3.075) U2.17@9.85,3.075
  L4-SIG w0.076: v6(10.75,6.95) 11.275,6.425 12.35,5.275 v6(12.35,4.1)
  Bottom Layer w0.076: JP4.1@5.225,3.025 5.45,2.925 5.775,2.6 5.8,2.6 5.825,2.575 5.85,2.575 5.875,2.55 5.925,2.55 5.95,2.525 6.35,2.525 6.375,2.5 7.4,2.5 7.425,2.525 7.55,2.525 7.575,2.55 7.625,2.55 7.65,2.575 7.675,2.575 7.7,2.6 7.725,2.6 7.95,2.825 v7(8.3,2.825) ; v7(9.825,3.075) 10.025,3.05 10.825,3.05 11.05,3.275 11.05,3.525 11.125,3.6 11.75,3.6 11.775,3.625 11.925,3.675 11.95,3.7 12.075,3.7 12.175,3.8 R90.1@12.35,3.875 ; R90.1@12.35,4.075 v6(12.35,4.1)
  other v2: 12.35,4.1 10.75,6.95
TDO: JP4.2 R4.4 R91.1 U2.18 | length 14
  L3-SIG w0.076: v1(8.975,4.475) v3(10.35,3.25) ; v1(10.975,4.4) 11.225,4.35 11.475,4.35 11.525,4.4 12.475,4.4 12.85,4.775 13.7,4.775 13.75,4.725 13.8,4.7 13.95,4.7 14,4.725 14.125,4.85 14.125,4.875 14.15,4.9 14.15,5.05 14.125,5.075 14.125,5.1 v1(12.875,6.35)
  L4-SIG w0.076: v6(9.125,4.85) 10.275,4.975 v1(10.975,4.4) ; v6(11.525,6.95) 11.725,6.925 11.975,6.675 12.275,6.675 v1(12.875,6.35)
  Bottom Layer w0.076: JP4.2@6.45,3.375 7.2,4.125 7.2,4.275 7.375,4.45 8.725,4.45 R91.1@8.75,4.475 ; R91.1@8.975,4.675 v6(9.125,4.85)
  other v2: 8.975,4.475 9.125,4.85 11.525,6.95
  other v5: 10.35,3.25
  other v6: 8.975,4.475
TMS: JP3.2 R4.5 R92.1 U2.19 | length 9.7
  Top Layer w0.076: v7(10.125,4.5) 10.525,3.6 10.725,3.4 U2.19@10.85,3.25
  L3-SIG w0.076: v7(10.125,4.5) v1(12.1,6.95)
  Bottom Layer w0.076: R4.5@12.45,6.95 12.575,6.95 12.8,6.725 14.35,6.725 14.4,6.675 15.3,6.675 15.325,6.65 15.875,6.65 15.95,6.575 17.125,6.575 JP3.2@17.375,6.45
  other v2: 12.1,6.95
  other v6: 12.1,6.95
UART_FT_CTS#: R93.1 U1.B16 U2.41 | length 11.4
  Top Layer w0.076: v3(12.35,4.675) 12.85,5.175 15.85,5.175 15.925,5.25 16.875,6.275 16.875,7.1 17.35,7.575 U2.41@17.85,7.575
  L3-SIG w0.076: v7(11.35,4.65) v3(12.35,4.675) ; v3(18.325,7.7) 20.25,7.7 20.275,7.675 21.025,7.675 21.15,7.55 v8@21.4,7.425
  other v4: 21.4,7.43
  other v5: 12.35,4.675 18.325,7.7
  other v8: 21.4,7.43
UART_FT_DTR#: U1.M18 U2.43 | length 4.6
  Top Layer w0.076: U2.43@18.4,8.75 18.55,8.875 18.825,9.15 18.825,10.55 19.65,11.375 19.65,12.025 19.675,12.05 19.675,12.075 19.775,12.175 20,12.175 20.1,12.275 20.125,12.275 20.175,12.325 20.2,12.325 20.225,12.35 20.275,12.35 20.3,12.375 U1.M18@20.325,12.375
UART_FT_RTS#: U1.L18 U2.40 | length 5.3
  Top Layer w0.076: U2.40@18.4,7.25 18.55,7.375 18.625,7.45 18.625,8.075 18.65,8.1 19.65,10.3 19.65,11.025 19.675,11.05 19.675,11.075 19.775,11.175 20,11.175 20.15,11.325 20.15,11.525 20.175,11.55 20.175,11.575 20.275,11.675 U1.L18@20.35,11.85
UART_FT_RXD: R94.1 U1.G19 U2.39 | length 9.4
  Top Layer w0.076: v3(16.375,5.3) 17.3,6.225 17.825,6.55 U2.39@17.85,6.55 ; U2.39@18.4,6.75 18.525,6.875 18.55,6.875 18.75,7.075 18.775,7.35 18.8,7.4 18.8,7.55 18.825,7.575 19.625,9.375 19.65,9.4 19.65,9.525 19.675,9.55 19.675,9.575 19.775,9.675 U1.G19@19.85,9.85
  L4-SIG w0.076: v9(12.65,4.7) 13.65,5.175 13.7,5.175 13.75,5.225 13.8,5.25 13.85,5.25 13.875,5.275 v3(16.375,5.3)
  Bottom Layer w0.076: R94.1@12.575,4.675 v9(12.65,4.7)
  other v1: 16.375,5.3
  other v5: 16.375,5.3
  other v10: 12.65,4.7
UART_FT_TXD: U1.K17 U2.38 | length 6.5
  L3-SIG w0.076: v3(17.85,6.225) 17.825,7.1 17.8,7.15 17.8,7.3 17.825,7.35 18.05,7.575 18.05,7.825 19,8.775 v1(19,9.3)
  L4-SIG w0.076: v1(19,9.3) 20.025,10.2 20.05,10.225 20.075,10.225 20.575,10.725 20.575,10.75 v1@20.9,11.425
  other v1: 20.9,11.43
  other v4: 20.9,11.43
  other v5: 17.85,6.225
  other v8: 20.9,11.43
UDQM: U1.L2 U3.F1 | length 9.1
  Top Layer w0.076: v3(35.625,8.275) U3.F1@35.65,8.275
  L3-SIG w0.1: v8@28.4,11.925 29.209,11.912 ; 29.2,11.9 v1(29.6,11.15) ; v1(30.825,10.5) 31.125,10.825 ; 31.132,10.833 31.5,10.5 31.85,10.15 31.9,10.125 32.675,10 32.725,9.975 32.8,9.9 32.825,9.9 34.45,8.275 v3(35.625,8.275)
  L4-SIG w0.1: v1(29.6,11.15) 29.675,11.05 29.7,11.025 29.7,11 29.85,10.85 29.875,10.85 29.9,10.825 30.5,10.825 v1(30.825,10.5)
  other v4: 28.4,11.93
  other v5: 35.625,8.275
  other v8: 28.4,11.93
USB5V0: C150.2 U8.13 X1.1 X2.19 | length 35.1
  Top Layer w0.25: 16,20.525 16.764,20.525 ; 18.673,20.525 19.436,20.525
  Top Layer w0.3: v7(15.6,20.925) 15.8,20.725 ; 16.764,20.525 17.146,20.525
  Top Layer w0.35: v7(5.15,16.575) 5.62,17.045 ; v7(7.1,8.75) X1.1@7.125,8.75 ; v7(7.25,13.6) X1.1@7.25,13.65 ; 15.8,20.725 16,20.525 ; 18.291,20.525 18.673,20.525 ; 19.436,20.525 19.818,20.525
  Top Layer w0.45: 3.387,8.2 v7(3.625,7.95)
  Top Layer w0.5: v7(3.15,8.45) 3.387,8.2 ; 5.62,17.045 v7(6.325,17.75) ; 17.146,20.525 18.291,20.525 ; 19.818,20.525 20.2,20.525 X2.19@20.975,21.3
  Bottom Layer w0.2: 5.394,15.525 5.475,15.175 5.5,15.15 5.5,15.1 5.75,14.85 6.35,14.85 6.375,14.825 6.425,14.825 6.45,14.8 6.5,14.8 6.575,14.75 7.05,14.275 ; 7.812,8.019 8.05,7.775 8.05,7.725 8.075,7.7 8.075,6.525 8.05,6.5 8.05,6.45 7.83,6.175 ; 8.392,19.861 8.65,20.125 8.675,20.15 8.675,20.2 8.75,20.275 8.8,20.275 8.825,20.3 9.15,20.355 ; 10.125,20.52 10.45,20.575 10.5,20.575 10.525,20.6 12.382,20.618 ; 13.175,20.65 13.225,20.65 13.25,20.675 13.3,20.7 13.325,20.7 13.35,20.725 13.4,20.75 13.45,20.775 ; 13.5,20.8 13.55,20.8 13.575,20.825 13.625,20.825 13.65,20.85 14.04,20.865
  Bottom Layer w0.25: 12.382,20.618 13.125,20.625 13.175,20.65 ; 13.45,20.775 13.5,20.8 ; 14.04,20.865 14.43,20.88
  Bottom Layer w0.3: 9.15,20.355 9.475,20.41 ; 14.43,20.88 15.21,20.91
  Bottom Layer w0.35: v7(5.15,16.575) 5.231,16.225 ; 5.312,15.875 5.394,15.525 ; v7(6.325,17.75) 6.583,18.014 ; 15.21,20.91 v7(15.6,20.925)
  Bottom Layer w0.4: 9.475,20.41 9.8,20.465
  Bottom Layer w0.45: v7(3.625,7.95) 3.872,7.662 ; 7.05,14.275 v7(7.125,14.025)
  Bottom Layer w0.5: 3.872,7.662 C150.2@6.1,5.075 ; 5.231,16.225 5.312,15.875 ; 6.583,18.014 8.392,19.861 ; C150.2@6.95,5.075 7.83,6.175 ; v7(7.1,8.75) 7.812,8.019 ; v7(7.25,9.2) v7(7.25,13.6) ; 9.8,20.465 10.125,20.52
USB-CC1: R27.2 X1.4 | length 11.2
  Top Layer w0.076: X1.4@7.125,12.575 7.025,12.525 6.925,12.45 6.75,12.275 6.75,12.125 6.625,12 6.6,11.95 6.6,9.55 5.875,8.825 5.875,8.8 5.825,8.75 5.8,8.7 5.8,7.975 5.55,7.725 5.55,6.5 6.525,5.525 6.775,4.95 6.9,4.825 6.9,4.675 6.925,4.65 7.375,3.65 7.55,3.475 7.55,3.25 7.575,3.225 7.575,3.2 7.6,3.175 7.6,3.075 7.675,3 R27.2@7.775,2.775
USB-CC2: R28.2 X1.MH1 | length 6.2
  Top Layer w0.076: v3(8,9.55) X1.MH1@8,9.575
  L3-SIG w0.076: v3(7.975,3.375) 8,3.425 v3(8,9.55)
  other v5: 7.975,3.375 8,9.55
USB_D_N: U2.7 X1.2 | length 4.4
  Top Layer w0.15: X1.2@7.125,11.275 6.95,11.35 6.925,11.375 6.9,11.375 6.825,11.45 6.825,11.475 6.8,11.5 6.8,11.85 6.825,11.875 6.825,11.9 6.9,11.975 6.925,11.975 6.95,12 X1.2@7.125,12.075 ; X1.2@8.25,11.075 8.45,11 8.475,10.975 8.5,10.975 8.575,10.9 8.575,10.875 8.6,10.85 8.675,8.95 8.7,8.925 8.7,8.9 8.725,8.875 8.725,8.475 8.75,8.45 8.75,8.425 8.875,8.3 U2.7@9,8.25
USB_D_P: U2.8 X1.3 | length 3.7
  L3-SIG w0.15: v3(7.25,10.775) v3(7.25,11.575) ; v3(8.25,10.575) v3(9,7.75)
  other v5: 9,7.75 8.25,10.575 7.25,10.775 7.25,11.575
VBATT: C151.2 U8.2 U8.3 X2.17 X4.1 | length 23.9
  Top Layer w0.2: 1.262,13.053 1.275,13.45 1.3,13.475 1.3,13.525 1.475,13.7 1.525,13.7 1.55,13.725 1.869,13.725 ; 1.456,6.909 1.55,6.525 1.575,6.5 1.575,6.45 1.775,6.156 ; 5.3,16.2 5.575,16.475 5.625,16.475 5.65,16.5 8.293,16.5 ; 10.944,20.494 11.2,20.675 11.25,20.675 11.275,20.7 11.612,20.863 ; 12.962,21.512 13.3,21.675 13.35,21.675 13.375,21.7 15.143,21.7
  Top Layer w0.25: 1.225,11.863 1.238,12.259 ; 5.025,15.925 5.3,16.2
  Top Layer w0.3: 1.238,12.259 1.25,12.656 ; 1.869,13.725 2.187,13.725 ; 2.506,13.725 2.825,13.725 3.1,14 ; 15.143,21.7 15.496,21.7
  Top Layer w0.35: v7(1.175,10.275) 1.188,10.672
  Top Layer w0.4: 1.188,10.672 1.2,11.069 ; 1.212,11.466 1.225,11.863 ; 1.25,12.656 1.262,13.053 ; 1.362,7.294 1.456,6.909
  Top Layer w0.5: v7(0.8,9.6) 1.362,7.294 ; 1.2,11.069 1.212,11.466 ; 1.775,6.156 v7(2.375,5.275) ; 2.187,13.725 2.506,13.725 ; 3.1,14 5.025,15.925 ; 8.293,16.5 X4.1@9.425,16.5 ; X4.1@10.175,19.95 10.944,20.494 ; 11.612,20.863 12.962,21.512 ; 15.496,21.7 X2.17@15.85,21.7
  Bottom Layer w0.2: U8.2@0.725,9.775 U8.3@0.725,10.125 ; v7(0.8,9.6) U8.2@0.8,9.625
  Bottom Layer w0.5: v7(2.375,5.275) C151.2@2.4,5.175
VCC1V0: C84.2 C85.1 C86.1 C87.1 C88.1 C89.1 C90.1 C91.1 C92.1 C140.1 C141.1 C142.1 C143.1 L3.2 U1.G10 U1.H10 U1.J10 U1.L10 U1.M10 U1.M11 U1.N10 U1.N11 U7.4 | length 46.5
  Top Layer w0.15: U1.M11@23.875,12.525 U1.N11@23.875,12.85
  Top Layer w0.2: U1.M11@23.95,12.35 U1.L10@24.325,11.975
  Top Layer w0.25: U1.G10@24.375,10.025 U1.H10@24.375,10.35 ; U1.H10@24.375,10.525 U1.J10@24.375,10.85 ; U1.L10@24.375,12.025 U1.M10@24.375,12.35 ; U1.M10@24.375,12.525 U1.N10@24.375,12.85
  L3-SIG w0.5: v6(23.5,10.95) v8@24.4,10.925 ; v7(23.6,3.8) v1(25.2,3.8) ; v7(24.4,9.175) v8@24.4,9.925 ; v7(29.975,11.8) 30.175,11.225 30.2,11.2 30.2,11.15 30.225,11.1 30.275,11.05 30.275,11.025 v1(30.325,10.425)
  L4-SIG w0.5: v6(12.975,9.75) v6(13.5,11.15) ; v6(20.375,3.8) v6(22.7,3.8) ; v6(21.35,11.275) 21.575,11.5 21.75,11.875 21.775,11.95 21.8,12 v6(21.875,12.175) ; v6(23.5,12.9) 23.55,12.9 23.575,12.875 23.6,12.875 23.625,12.85 23.65,12.85 23.825,12.675 23.85,12.625 23.85,12.6 23.875,12.575 23.875,12.525 23.9,12.5 23.9,12.425 v9(24.075,12.1) ; v1(25.2,3.8) 25.45,3.8 25.65,3.6 25.675,3.6 25.7,3.575 25.75,3.575 25.775,3.55 v6(28.325,3.475)
  Bottom Layer w0.15: 15.637,11.075 15.775,10.775 15.8,10.75 15.8,10.725 16,10.525 ; 19.188,4.942 19.2,4.55 19.225,4.525 19.225,4.5 19.375,4.35 ; 22.45,12.506 23.15,12.769 ; 25.15,12.05 25.525,12.05 25.6,11.975 25.625,11.975 25.65,11.95 26,11.95 26.025,11.975 26.05,11.975 26.2,12.125 ; 27.213,12.512 27.45,12.525 27.775,12.525 27.825,12.575 27.85,12.575 27.875,12.6 29.318,12.886 ; 29.667,14.417 29.3,14.475 29.275,14.5 29.25,14.5 29.1,14.65 29.1,14.675 29.075,14.7 29.075,14.9 29.1,14.925 29.1,14.95 29.25,15.1 29.275,15.1 29.3,15.125 29.667,15.125 ; 29.679,12.957 30.039,13.029 ; 29.95,13 29.956,12.7 ; 30.525,10.325 30.7,10.15 ; 31.575,12.938 31.75,12.775 33.275,12.775 33.3,12.8 33.325,12.8 33.4,12.875 33.425,12.875 C142.1@33.9,13.1
  Bottom Layer w0.2: 19.162,5.725 19.188,4.942 ; C91.1@22.1,12.175 22.66,11.685 ; C91.1@22.1,12.375 22.45,12.506 ; 30.039,13.029 C141.1@30.4,13.1 ; 30.7,10.15 30.725,10.15 30.75,10.125 ; 31.907,9.889 32.679,9.732
  Bottom Layer w0.25: 19.375,4.35 C87.1@19.5,4.075 ; 23.15,12.769 v6(23.5,12.9) ; 26.2,12.125 C90.1@26.325,12.175 ; 30.5,10.375 30.525,10.35 30.525,10.325 ; 30.75,10.125 31.136,10.046
  Bottom Layer w0.3: 16,10.525 C85.1@16.125,10.25 ; 19.15,6.117 19.162,5.725 ; 21.021,11.129 v6(21.35,11.275) ; 22.66,11.685 22.94,11.44 ; v9(24.075,12.1) C89.1@24.1,12.175 ; C89.1@24.325,12.175 24.55,12.113 ; v7(24.4,9.175) C92.1@24.5,9 ; C90.1@26.525,12.375 26.75,12.438 ; 29.318,12.886 29.679,12.957 ; v1(30.325,10.425) 30.5,10.425 30.5,10.375
  Bottom Layer w0.35: 22.94,11.44 23.22,11.195 ; 29.667,15.125 30.033,15.125 ; 29.969,12.1 v7(29.975,11.8) ; C143.1@30.4,15.1 C143.1@30.4,15.2
  Bottom Layer w0.4: 23.22,11.195 v6(23.5,10.95) ; 26.975,12.5 27.213,12.512 ; 30.033,15.125 C143.1@30.4,15.125
  Bottom Layer w0.45: L3.2@15.5,11.375 15.637,11.075 ; 29.667,14.417 30.033,14.358 ; C141.1@31.4,13.1 31.575,12.938
  Bottom Layer w0.5: v6(13.5,11.15) L3.2@13.7,11.375 ; C85.1@17.3,9.25 C86.1@17.875,9.25 ; C86.1@19.05,9.25 19.15,6.117 ; C86.1@19.05,10.25 21.021,11.129 ; C87.1@20.35,3.8 v6(20.375,3.8) ; C88.1@23.55,3.8 v7(23.6,3.8) ; 24.55,12.113 24.775,12.05 25.15,12.05 ; 26.75,12.438 26.975,12.5 ; v6(28.325,3.475) C84.2@28.4,3.475 ; 29.956,12.7 29.969,12.1 ; 30.033,14.358 C141.1@30.4,14.3 ; 31.136,10.046 31.907,9.889 ; 32.679,9.732 33.45,9.575 C140.1@33.6,9.5
  other v1: 23.5,10.95 24.4,11.93 23.9,12.43 23.9,12.93
  other v2: 28.325,3.475 20.375,3.8 22.7,3.8 12.975,9.75 30.325,10.425 23.5,10.95 13.5,11.15 21.35,11.275 21.875,12.175 23.5,12.9
  other v4: 24.4,9.93 24.4,10.93 24.4,11.93 23.9,12.43 23.9,12.93
  other v6: 30.325,10.425
  other v8: 24.4,9.93 24.4,10.93 24.4,11.93 23.9,12.43 23.9,12.93
  other v10: 24.075,12.1
VCC1V8: C82.2 C93.1 C94.1 C95.1 C96.1 C144.1 L2.2 L7.1 U1.C9 U1.H13 U1.J13 U6.4 | length 31.7
  Top Layer w0.15: U1.H13@22.875,10.525 U1.J13@22.875,10.85
  L3-SIG w0.15: v7(18.65,12.5) 19.2,11.95 19.2,9.825 19.225,9.8 19.225,9.775 19.375,9.625 19.4,9.625 19.425,9.6 v1(20.025,9.4) ; v1@22.9,10.425 23.45,10.25 23.475,10.225 23.5,10.225 23.525,10.2 23.55,10.2 23.85,9.9 23.85,9.075 v1@24.9,7.925
  L4-SIG w0.15: v6(12.975,13.75) 13.2,14.85 v6(13.7,15.375) ; v9(22.1,9) v6(22.1,9.6) ; v6(22.55,10.75) v1@22.9,10.925 ; v6(22.575,10.15) v1@22.9,10.425 ; v1@24.9,7.925 25.425,8.375 25.825,8.4 25.85,8.425 25.875,8.425 26.15,8.7 v6(26.325,8.775) ; v9(25.2,6.875) v6(25.825,7.05)
  Bottom Layer w0.15: L2.2@15.5,15.375 15.775,14.775 15.8,14.75 15.8,14.725 16,14.525 C93.1@16.125,14.25 ; C93.1@17.3,13.25 C144.1@17.875,13.25 ; v7(18.65,12.5) C144.1@18.65,13.25 ; C144.1@19.05,14.25 19.375,14.6 v7(19.475,17.625) ; v1(20.025,9.4) v6(22.55,10.75) ; C94.1@20.35,5.475 C95.1@21.875,8.775 ; v6(22.1,9.6) v6(22.575,10.15) ; v9(25.2,6.875) 27.025,5.125 C82.2@27.6,4.875 ; v6(25.825,7.05) v6(26.325,8.775)
  other v1: 24.9,7.93 22.9,10.43 22.9,10.93
  other v2: 25.825,7.05 26.325,8.775 20.025,9.4 22.1,9.6 22.575,10.15 22.55,10.75 12.975,13.75 13.7,15.375
  other v4: 24.9,7.93 22.9,10.43 22.9,10.93
  other v6: 20.025,9.4
  other v8: 24.9,7.93 22.9,10.43 22.9,10.93
  other v10: 25.2,6.875 22.1,9
VCC3V3: BTN.1 BTN.2 C3.2 C4.2 C5.2 C6.2 C7.2 C8.2 C9.2 C11.2 C12.2 C13.2 C38.2 C80.2 C97.1 C98.1 C99.1 C100.1 C101.1 C102.1 C103.1 C104.1 C105.1 C106.1 C107.1 C108.1 C109.1 C110.1 C111.1 C112.1 C113.1 C114.1 C115.1 C116.1 C117.1 C118.1 C119.1 C120.1 C121.1 C122.1 C133.2 C134.2 C135.2 C136.2 C137.2 C138.2 C145.1 C146.1 C155.2 C156.2 C157.2 C158.2 C159.2 JP4.3 L1.2 L4.2 L5.2 LD5.A Q1.1 Q1.4 R1.3 R1.4 R2.2 R4.8 R6.2 R7.2 R19.2 R20.2 R23.1 R34.5 R34.6 R34.7 R34.8 R35.2 R80.1 R81.1 R82.1 R90.2 R91.2 R92.2 R93.2 R94.2 R96.2 R97.2 R98.2 R99.2 U1.B19 U1.C14 U1.C18 U1.F17 U1.G12 U1.G13 U1.H3 U1.J7 U1.K1 U1.K7 U1.K12 U1.K13 U1.L7 U1.L12 U1.L13 U1.M7 U1.M8 U1.M12 U1.M17 U1.N7 U1.N8 U1.R1 U1.R17 U1.U13 U1.V1 U1.V6 U1.V9 U1.V11 U2.20 U2.31 U2.42 U2.50 U2.56 U3.A7 U3.A9 U3.B3 U3.C7 U3.D3 U3.E7 U3.J9 U4.8 U5.4 U10.8 X2.2 X3.4 X5.2
  other v1: 11.35,2.675 16.85,2.675 49.2,4.125 47.775,4.3 28,4.375 47.775,5.45 41.125,6.025 45.275,6.025 19.9,7.43 20.4,7.93 22.4,7.93 17.85,8.05 45.125,8.975 20.9,9.43 32.575,9.675 34.175,9.675 22.9,9.93 23.4,9.93 27.9,10.43 25.9,10.93 22.9,11.43 23.4,11.43 25.9,11.43 28.9,11.43 13.85,11.525 16.85,11.525 22.9,11.93 23.4,11.93 25.9,11.93 20.9,12.43 23.4,12.43 25.4,12.43 25.9,12.43 31.775,12.875 33.375,12.875 34.975,12.875 9.225,12.9 25.4,12.93 25.9,12.93 20.9,13.93 28.9,13.93 31.775,14.475 38.175,14.475 13.675,14.85 15.375,14.85 22.9,14.93 23.9,15.43 24.9,15.43 26.4,15.43 28.9,15.43 18.15,16.775 30.35,16.775 31.575,16.775 27.775,16.85 33.55,16.875 46.75,17.325 30.775,17.35
  other v2: 17.775,2.55 19.95,2.55 21.15,2.55 22.35,2.55 23.575,2.55 24.775,2.55 25.95,2.55 30.3,2.7 33.5,2.7 7.275,2.775 15.275,3.275 18.175,3.275 12.95,3.875 30.3,4.1 33.5,4.1 9.375,4.475 10.55,4.475 11.75,4.475 12.95,4.475 14.15,4.475 16.575,4.475 22.7,4.7 15.5,5.2 30.3,5.5 33.5,5.5 31.55,6.875 33.95,6.875 36.375,6.875 14.525,6.95 32,8.2 28.55,8.775 37.75,11.025 30.85,11.8 32,11.8 33.15,11.8 34.3,11.8 35.45,11.8 36.6,11.8 28.55,12.175 9.95,12.45 8.15,13.95 33.9,15.2 21.875,15.575 28.55,15.575 12.925,16.9 12.525,16.925 24.95,17.15 26.15,17.15 28.575,17.15 17.875,17.25 33.9,17.3 19.8,17.35 20.6,17.35 21.6,17.35 22.425,17.35 23.2,17.35 24,17.35 24.95,17.775 26.15,17.775 27.35,17.775 28.575,17.775 24.95,18.35 28.575,18.35 16.53,18.9 16.93,18.9 16.125,18.95 25.575,18.975 29.15,18.975 14.175,19.35 14.575,19.35 14.975,19.35 13.775,19.375 25.575,19.575 29.15,19.575 26.775,19.65 27.95,19.65
  other v3: 11.35,2.675 16.85,2.675 49.2,4.125 47.775,4.3 47.775,5.45 41.125,6.025 45.275,6.025 17.85,8.05 45.125,8.975 32.575,9.675 34.175,9.675 13.85,11.525 16.85,11.525 31.775,12.875 33.375,12.875 34.975,12.875 9.225,12.9 31.775,14.475 38.175,14.475 13.675,14.85 15.375,14.85 18.15,16.775 30.35,16.775 31.575,16.775 27.775,16.85 33.55,16.875 46.75,17.325 30.775,17.35
  other v4: 28,4.375 19.9,7.43 20.4,7.93 22.4,7.93 20.9,9.43 22.9,9.93 23.4,9.93 27.9,10.43 25.9,10.93 22.9,11.43 23.4,11.43 25.9,11.43 28.9,11.43 22.9,11.93 23.4,11.93 25.9,11.93 20.9,12.43 23.4,12.43 25.4,12.43 25.9,12.43 25.4,12.93 25.9,12.93 20.9,13.93 28.9,13.93 22.9,14.93 23.9,15.43 24.9,15.43 26.4,15.43 28.9,15.43
  other v5: 11.35,2.675 16.85,2.675 49.2,4.125 47.775,4.3 47.775,5.45 41.125,6.025 45.275,6.025 17.85,8.05 45.125,8.975 32.575,9.675 34.175,9.675 13.85,11.525 16.85,11.525 31.775,12.875 33.375,12.875 34.975,12.875 9.225,12.9 31.775,14.475 38.175,14.475 13.675,14.85 15.375,14.85 18.15,16.775 30.35,16.775 31.575,16.775 27.775,16.85 33.55,16.875 46.75,17.325 30.775,17.35
  other v6: 11.35,2.675 16.85,2.675 49.2,4.125 47.775,4.3 47.775,5.45 41.125,6.025 45.275,6.025 17.85,8.05 45.125,8.975 32.575,9.675 34.175,9.675 13.85,11.525 16.85,11.525 31.775,12.875 33.375,12.875 34.975,12.875 9.225,12.9 31.775,14.475 38.175,14.475 13.675,14.85 15.375,14.85 18.15,16.775 30.35,16.775 31.575,16.775 27.775,16.85 33.55,16.875 46.75,17.325 30.775,17.35
  other v8: 28,4.375 19.9,7.43 20.4,7.93 22.4,7.93 20.9,9.43 22.9,9.93 23.4,9.93 27.9,10.43 25.9,10.93 22.9,11.43 23.4,11.43 25.9,11.43 28.9,11.43 22.9,11.93 23.4,11.93 25.9,11.93 20.9,12.43 23.4,12.43 25.4,12.43 25.9,12.43 25.4,12.93 25.9,12.93 20.9,13.93 28.9,13.93 22.9,14.93 23.9,15.43 24.9,15.43 26.4,15.43 28.9,15.43
  other v9: 28,4.375 19.9,7.43 20.4,7.93 22.4,7.93 20.9,9.43 22.9,9.93 23.4,9.93 27.9,10.43 25.9,10.93 22.9,11.43 23.4,11.43 25.9,11.43 28.9,11.43 22.9,11.93 23.4,11.93 25.9,11.93 20.9,12.43 23.4,12.43 25.4,12.43 25.9,12.43 25.4,12.93 25.9,12.93 20.9,13.93 28.9,13.93 22.9,14.93 23.9,15.43 24.9,15.43 26.4,15.43 28.9,15.43
  other v10: 24.225,15.575 26.525,15.75 27.55,17.2 30.4,17.3
VCCADC: C123.1 C124.1 L7.2 U1.C13 | length 16.7
  Top Layer w0.15: L7.2@21.175,18.275 25.05,18.275 25.425,18.65 25.45,18.65 25.475,18.675 25.725,18.675 v7(26.1,18.3)
  L3-SIG w0.15: v1(20.425,11.15) 20.5,11.15 20.65,11 20.675,11 20.7,10.975 20.725,10.975 20.75,10.95 21.225,10.95 v1(21.75,10.425)
  L4-SIG w0.15: v6(20.25,17) v1(20.475,17.575) ; v6(20.375,11.85) v1(20.425,11.15) ; v1(21.75,10.425) v9(23.15,9.025) ; v1@22.9,7.925 v6(23.125,8.25)
  Bottom Layer w0.15: v6(20.25,17) 20.25,12.1 20.275,12.075 20.275,12.05 20.325,12 20.325,11.9 v6(20.375,11.85) ; v6(23.125,8.25) C123.1@23.25,8.775 ; v9(23.15,9.025) C123.1@23.25,9 ; v7(26.1,18.3) C124.1@26.275,18.475
  other v1: 22.9,7.93
  other v2: 23.125,8.25 20.375,11.85 20.25,17
  other v3: 20.475,17.575
  other v4: 22.9,7.93
  other v5: 20.475,17.575
  other v8: 22.9,7.93
  other v10: 23.15,9.025
VU: C78.2 C147.2 C148.2 C149.2 R26.1 R107.2 R108.2 U5.1 U6.1 U7.1 U8.5 U8.10 U8.11 | length 35.5
  Top Layer w0.2: 8.154,6 8.25,6.375 8.275,6.4 8.275,6.45 v7(8.55,6.725)
  Top Layer w0.5: v7(7.675,4.125) 8.154,6
  Bottom Layer w0.2: 2.7,14.375 3.413,14.375 ; 2.762,16.75 3.025,16.625 3.075,16.625 3.1,16.6 3.475,16.5 3.5,16.475 3.55,16.475 3.625,16.4 3.625,16.35 3.65,16.325 3.65,15.175 3.625,15.15 3.625,15.1 3.55,15.025 3.5,15.025 3.475,15 3.231,14.819 ; 2.875,16.6 3.625,16.612 ; 2.91,12.235 2.675,12 2.625,12 2.6,11.975 2.025,11.975 1.675,11.625 1.675,11.575 1.725,11.675 1.875,11.825 1.925,11.825 1.95,11.85 3.25,11.85 3.275,11.825 3.325,11.825 3.55,11.6 ; 3.425,14.375 3.75,14.375 3.775,14.35 3.8,14.35 3.85,14.3 3.85,14.275 3.875,14.25 3.875,14.1 ; U8.11@3.525,9.775 U8.10@3.525,10.125 ; 3.615,12.94 3.85,13.175 3.85,13.225 3.875,13.25 3.875,14.111 ; U8.10@3.975,10.275 4.05,10.3 4.225,10.475 4.225,10.525 4.25,10.55 4.25,10.85 4.225,10.875 4.225,10.925 4,11.15 ; 4.375,16.625 4.45,16.675 4.675,16.837 ; 7.8,13.7 7.8,14.05 7.825,14.075 7.825,14.125 7.925,14.25 7.95,14.275 7.95,14.325 8.025,14.4 8.075,14.4 8.1,14.425 8.4,14.6 ; 7.9,13.45 7.925,13.425 7.925,13.25 7.95,13.225 7.95,13.2 8.1,13.05 ; 8.1,13.035 8.325,12.75 8.35,12.725 8.35,12.675 8.567,12.433 ; 8.63,9.825 8.65,10.6 ; 8.783,16.65 8.675,17 8.675,17.025 8.65,17.05 8.65,17.1 8.625,17.125 8.65,18.425 8.675,18.45 8.675,18.5 8.838,18.725
  Bottom Layer w0.25: 3.625,16.612 4.375,16.625 ; 7.85,13.575 7.9,13.45 ; 8.61,9.05 8.63,9.825
  Bottom Layer w0.3: 8.567,12.433 8.783,12.192 ; 8.6,8.662 8.61,9.05
  Bottom Layer w0.35: 7.8,13.7 7.84,13.572 ; 8.1,13.025 8.1,13.05 ; v7(8.55,6.725) 8.58,7.888 ; 8.65,10.6 8.825,10.775
  Bottom Layer w0.4: R108.2@2.5,16.875 2.762,16.75 ; 2.688,16.738 2.875,16.6 ; 8.58,7.888 8.59,8.275
  Bottom Layer w0.45: 2.91,12.235 3.145,12.47 ; 3.55,11.6 4,11.15 ; 4.675,16.837 C78.2@4.9,17 ; 8.838,18.725 C147.2@9,18.95
  Bottom Layer w0.5: R108.2@2.5,16.875 2.688,16.738 ; 2.7,14.375 2.5,14.275 3.231,14.819 ; 3.145,12.47 3.615,12.94 ; C78.2@5.9,17 7.9,17 9,15.95 8.783,16.65 ; 8.4,14.6 C148.2@9,14.95 ; 8.59,8.275 8.6,8.662 ; 8.783,12.192 C149.2@9,11.95 ; 8.825,10.775 C149.2@9,10.95 ; C149.2@10.2,11.425 U7.1@10.625,11.425 ; C148.2@10.2,15.425 U6.1@10.625,15.425 ; C147.2@10.2,19.425 U5.1@10.625,19.425
WE#: U1.V5 U3.F9 | length 13.7
  Top Layer w0.076: U1.V5@26.95,15.35 27.025,15.175 27.125,15.075 27.125,15.05 27.15,15.025 27.15,14.825 27.225,14.75 27.225,14.725 v3(27.325,14.525) ; v4(27.625,12.675) 27.65,12.7 27.65,13.025 27.675,13.05 27.675,13.075 27.775,13.175 28,13.175 28.15,13.325 28.15,13.55 28.275,13.675 28.5,13.675 28.65,13.825 28.65,14.05 28.775,14.175 29.425,14.175 29.7,14.45 31.4,14.45 31.7,14.15 31.925,14.15 31.95,14.125 31.975,14.125 32.1,14 32.1,13.975 32.125,13.95 32.125,13.825 32.45,13.5 32.7,13.5 32.725,13.525 32.75,13.525 32.775,13.55 32.8,13.55 32.875,13.625 32.875,13.65 32.925,13.7 32.925,13.825 33.4,14.3 33.5,14.3 33.55,14.325 33.575,14.35 33.6,14.35 33.675,14.425 33.675,14.45 33.725,14.5 33.725,14.675 34.325,15.275 34.575,15.275 35.3,15.025 U3.F9@35.65,14.675
  L3-SIG w0.1: v3(27.325,14.525) 27.575,12.9 27.6,12.825 v4(27.625,12.675)
  other v5: 27.325,14.525
  other v8: 27.625,12.675
pads on no net: U1.A2 U1.A8 U1.A10 U1.A16 U1.A17 U1.B2 U1.B8 U1.B10 U1.B15 U1.D1 U1.D2 U1.E19 U1.J17 U1.J18 U1.K18 U1.T17 U1.T18 U1.U3 U1.U18 U1.U19 U1.V15 U1.V19 U1.W6 U1.W7 U1.W13 U1.W17 U1.W19 U2.3 U2.23 U2.24 U2.26 U2.27 U2.28 U2.29 U2.30 U2.32 U2.33 U2.34 U2.36 U2.44 U2.45 U2.46 U2.48 U2.52 U2.53 U2.54 U2.55 U2.57 U2.58 U2.59 U2.EP U3.E2 U4.EP U10.6 U10.7 U10.EP X1. X1.SBU1 X1.SBU2 X2. X3.A X3.B X4.MP1 X4.MP2

## Polygon pours and split planes (outlines as drawn)
GND on L2-GND "L2_GND_FEATHER" (solid, remove dead copper, pour order 2): 0.25,2.54 0.25,20.32 cw(c2.54,20.32) 2.54,22.61 48.26,22.61 cw(c48.26,20.32) 50.55,20.32 50.55,2.54 cw(c48.26,2.54) 48.26,0.25 2.54,0.25 cw(c2.54,2.54)
VCC3V3 on L5-VCC3V3 "L5_VCC3V3_FEATHER" (solid, remove dead copper, pour order 3): 0.25,2.54 0.25,20.32 cw(c2.54,20.32) 2.54,22.61 48.26,22.61 cw(c48.26,20.32) 50.55,20.32 50.55,2.54 cw(c48.26,2.54) 48.26,0.25 2.54,0.25 cw(c2.54,2.54)

## Silkscreen, mask and mechanical layers (free items; w line width, h text height)
Top Overlay:
  text "BAT" at 15.443,19.541 h0.8
  text "EN" at 18.383,19.541 h0.8
  text "USB" at 20.523,19.541 h0.8
  text "D13" at 23.13,19.541 h0.8
  text "D12" at 25.67,19.541 h0.8
  text "D11" at 28.343,19.541 h0.8
  text "D10" at 30.75,19.541 h0.8
  text "D9" at 33.623,19.541 h0.8
  text "D6" at 36.163,19.541 h0.8
  text "D5" at 38.703,19.541 h0.8
  text "SCL" at 40.823,19.541 h0.8
  text "SDA" at 43.403,19.541 h0.8
  text "ASAR" at 39.9,9.95 h1.2
  text "A7" at 41.1,8.25 h1.2
  text "BTN" at 42.25,6.995 h0.8
  text "A1" at 18.975,3.925 h0.8
  text "A5" at 28.543,2.519 h0.8
  text "SCK" at 30.683,2.519 h0.8
  text "MO" at 33.623,2.519 h0.8
  text "MI" at 36.297,2.519 h0.8
  text "RX" at 38.703,2.519 h0.8
  text "TX" at 41.243,2.519 h0.8
  text "D4" at 43.783,2.519 h0.8
  text "A4" at 27.75,2.5 h0.8 r90
  text "RS" at 3.765,0.415 h0.8
Mechanical 1:
  the board outline again, w0.1